# Altium PCB V24Cxx(Micro)_ky.PcbDoc
Units mm, origin at the board's own origin, x right, y up, seen from the top; angles counter-clockwise.
Board outline 77.5 x 78 mm, 2 copper layers (Top Layer, Bottom Layer); 10 components, 8 nets, 95 pads, 12 vias.
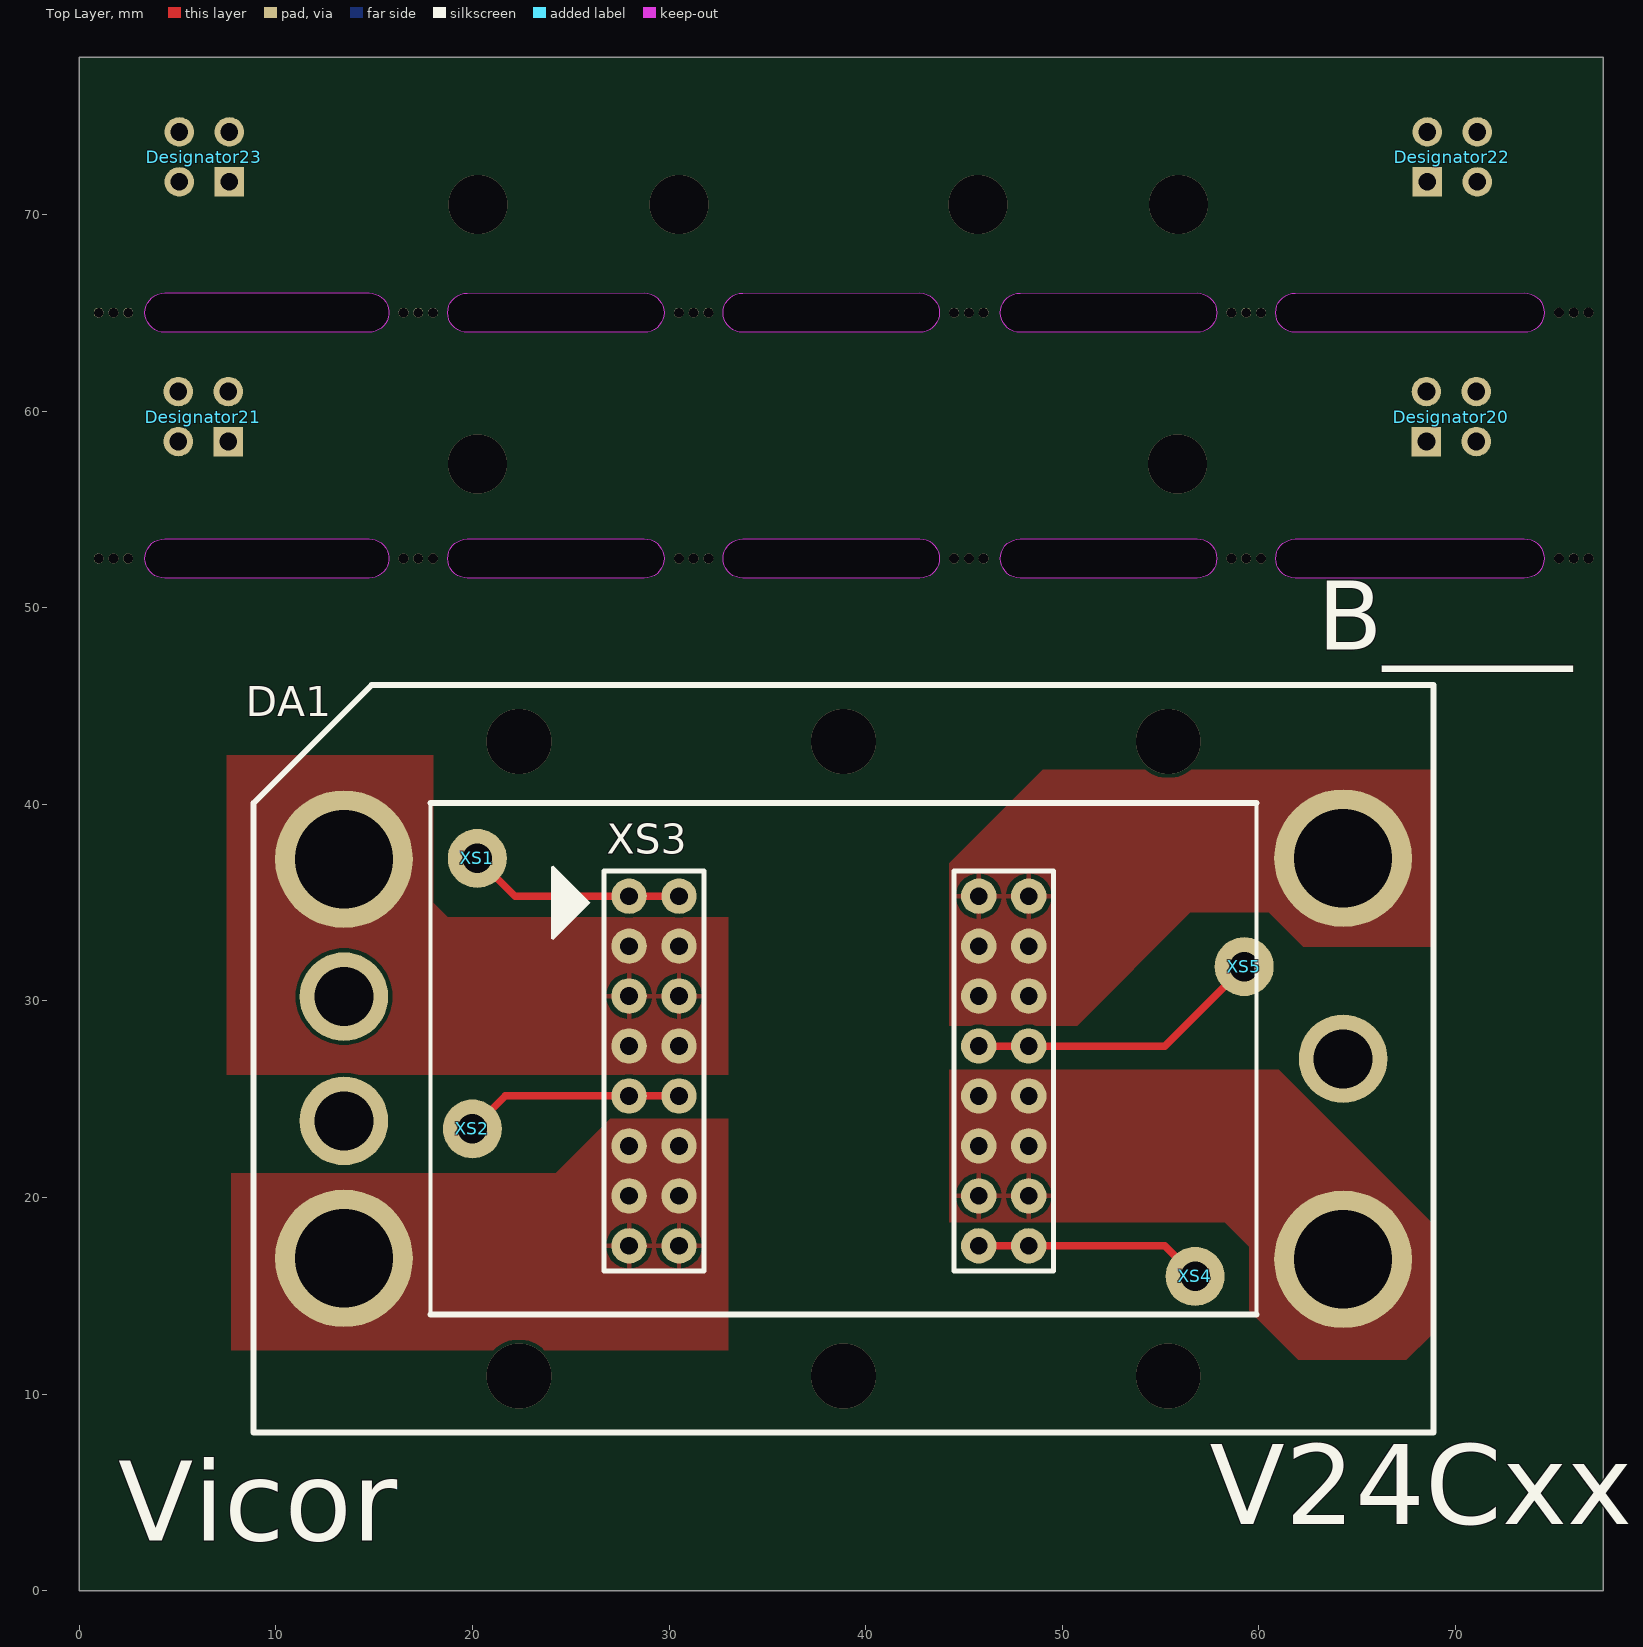
[diagram p0: Top Layer view]
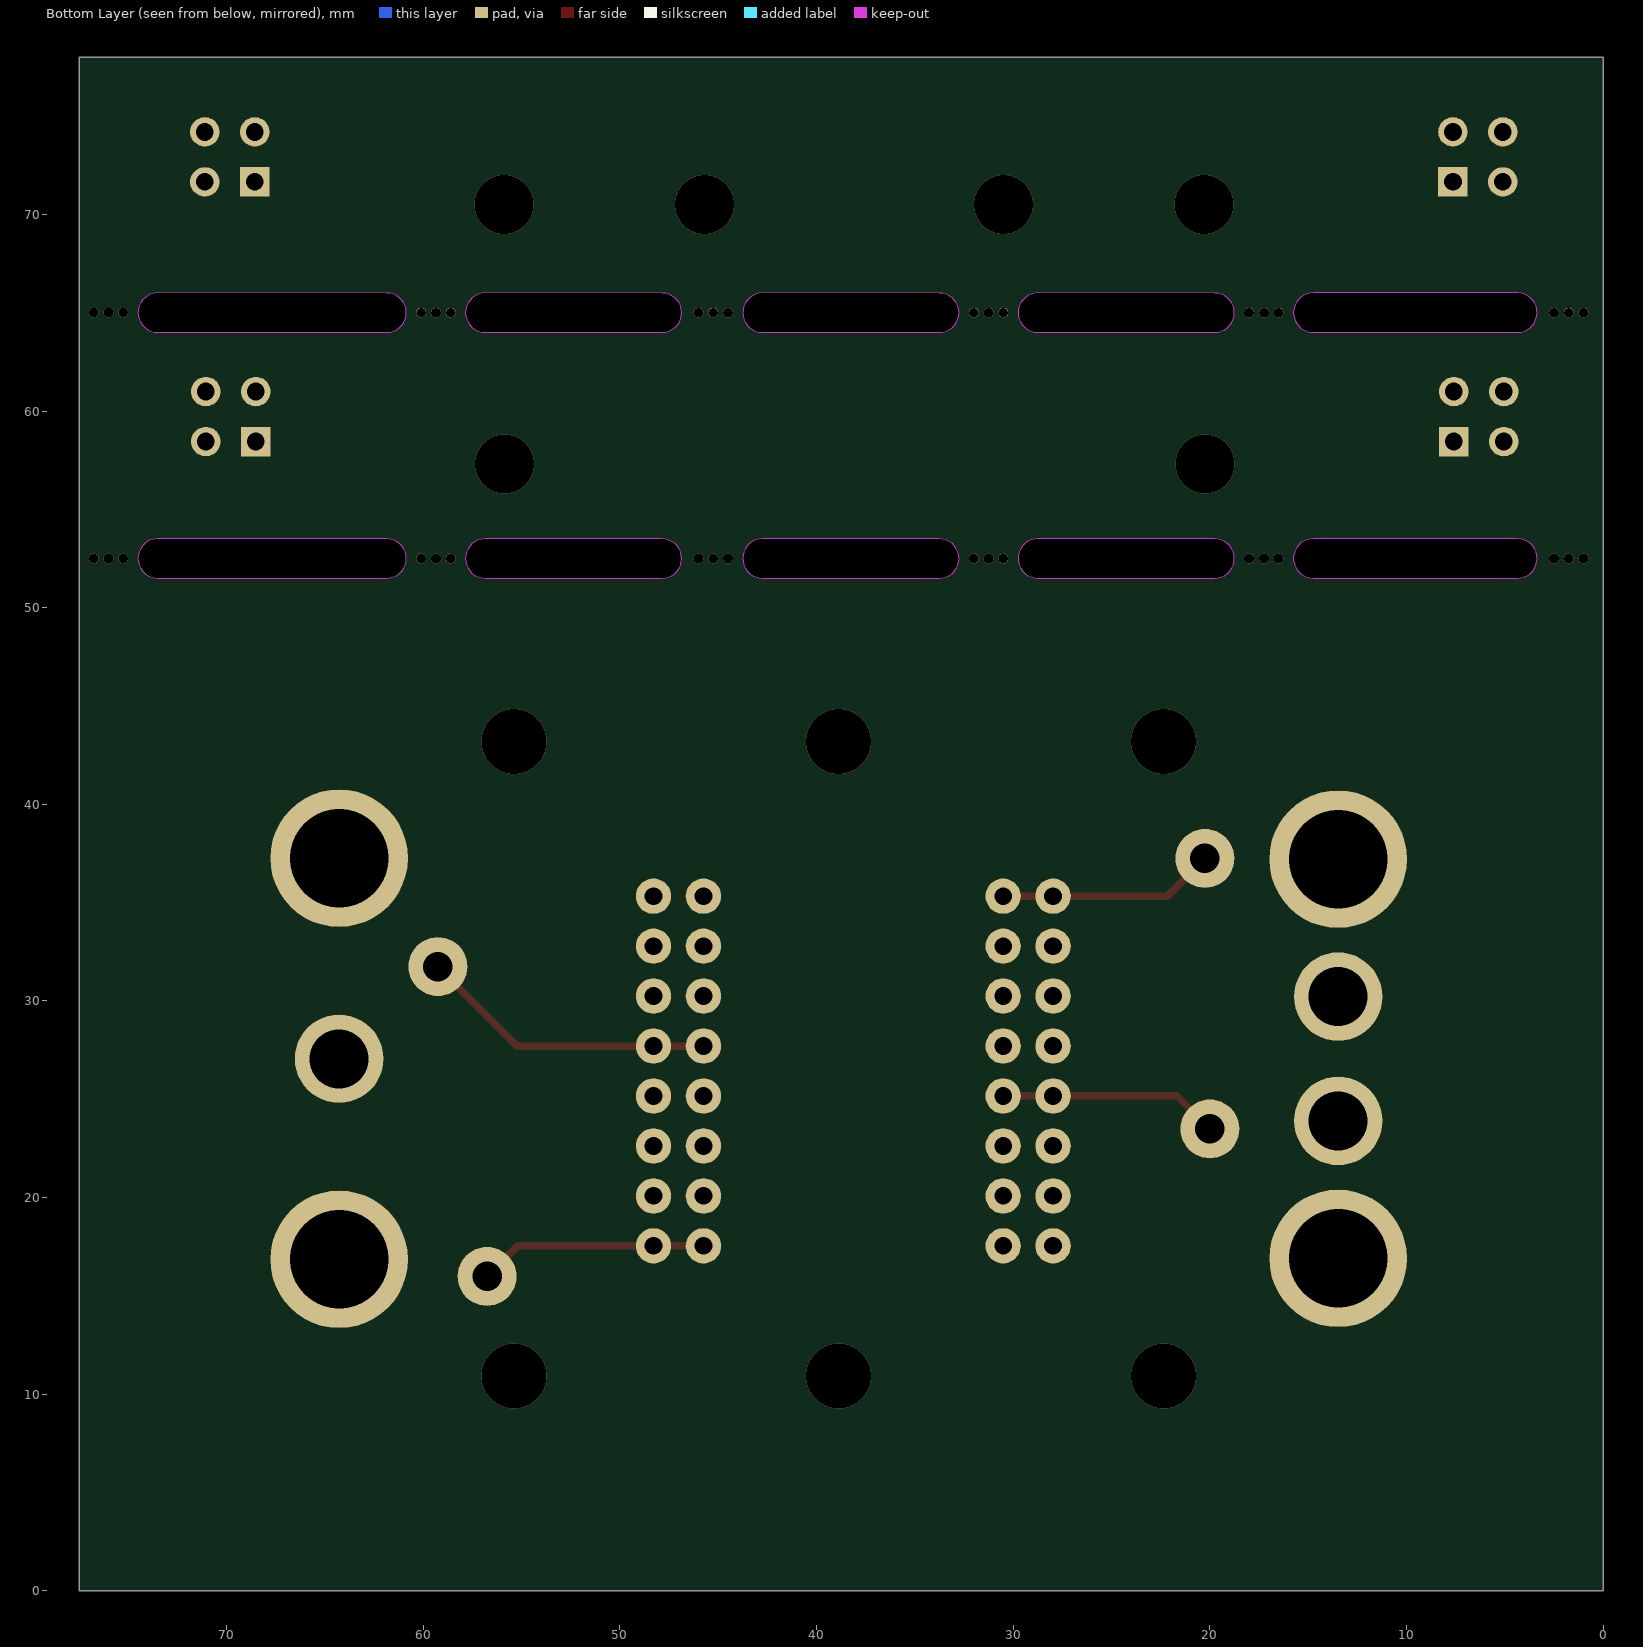
[diagram p1: Bottom Layer view, seen from below]

## Layer stack, top to bottom
Top Solder: solder mask 0.0102, Solder Resist, Dk 3.5
Top Layer: signal copper 0.0356
Dielectric 1: dielectric 0.32, FR-4, Dk 4.8
Bottom Layer: signal copper 0.0356
Bottom Solder: solder mask 0.0102, Solder Resist, Dk 3.5

## Board outline
0,0 0,78 77.5,78 77.5,0
cut-out: 4.351,66 14.75,66.002 cw(c14.75,65.002) 14.75,64.001 4.354,64.001 cw(c4.354,65.001)
cut-out: 19.748,66 28.75,66.001 cw(c28.75,65.001) 28.75,64 19.751,64 cw(c19.751,65)
cut-out: 33.748,66 42.75,66.001 cw(c42.75,65.001) 42.75,64 33.751,64 cw(c33.751,65)
cut-out: 47.848,66 56.85,66.001 cw(c56.85,65.001) 56.85,64 47.851,64 cw(c47.851,65)
cut-out: 61.848,66 73.5,66.002 cw(c73.5,65.001) 73.5,64 61.851,64 cw(c61.851,65)
cut-out: 61.848,53.5 73.5,53.502 cw(c73.5,52.501) 73.5,51.5 61.851,51.5 cw(c61.851,52.5)
cut-out: 47.848,53.5 56.85,53.501 cw(c56.85,52.501) 56.85,51.5 47.851,51.5 cw(c47.851,52.5)
cut-out: 33.748,53.5 42.75,53.501 cw(c42.75,52.501) 42.75,51.5 33.751,51.5 cw(c33.751,52.5)
cut-out: 19.748,53.5 28.75,53.501 cw(c28.75,52.501) 28.75,51.5 19.751,51.5 cw(c19.751,52.5)
cut-out: 4.351,53.5 14.75,53.502 cw(c14.75,52.502) 14.75,51.501 4.354,51.501 cw(c4.354,52.501)

## Design rules (kind name [scope] priority, off if disabled: settings)
BoardOutlineClearance [All] p1: gap=0.5 ignorepadtopadclearanceinfootprint=FALSE
Clearance [All] p1: gap=0.2 ignorepadtopadclearanceinfootprint=FALSE
ComponentClearance [All] p1: gap=0.254 collisioncheckmode=3 verticalgap=-1816.048 showdistances=FALSE
DiffPairsRouting [All] p1: maxlimit=0.15 minlimit=0.15 mostfreqgap=0.15 toplayer_minwidth=0.25 toplayer_maxwidth=0.25 toplayer_prefwidth=0.25 bottomlayer_minwidth=0.25 bottomlayer_maxwidth=0.25 bottomlayer_prefwidth=0.25 maxuncoupledlength=10
HoleSize HoleSize_UnPlatedPads [IsPad and not PadIsPlated] p1: absolutevalues=TRUE maxlimit=999 minlimit=0.5 maxpercent=80.000 minpercent=20.000
HoleSize HoleSize_PlatedPads [IsPad and PadIsPlated] p2: absolutevalues=TRUE maxlimit=999 minlimit=0.3 maxpercent=80.000 minpercent=20.000
MinimumAnnularRing MinimumAnnularRing_Pad [IsPad and PadIsPlated] p1: minimumring=0.2
MinimumAnnularRing MinimumAnnularRing_Via [IsVia] p2: minimumring=0.2
MinimumSolderMaskSliver [All] p1: minsoldermaskwidth=0.15
PlaneClearance [All] p1: clearance=0.3
PlaneConnect PlaneConnect_Via [IsVia] p1: planeconnectstyle=Direct reliefexpansion=0.508 reliefentries=4 reliefconductorwidth=0.254 reliefairgap=0.254
PlaneConnect PlaneConnect_Via_Thermal [IsVia or InPadClass('ThermalPads')] p2: planeconnectstyle=Direct reliefexpansion=0.508 reliefentries=4 reliefconductorwidth=0.254 reliefairgap=0.254
PlaneConnect [All] p3: planeconnectstyle=Relief reliefexpansion=0.5 reliefentries=4 reliefconductorwidth=0.25 reliefairgap=0.3
PolygonConnect PolygonConnect_Via [IsVia] p1: connectstyle=Direct reliefconductorwidth=0.254 reliefentries=4 polygonreliefangle="90 Angle" airgapwidth=0.254
PolygonConnect [All] p2: connectstyle=Relief reliefconductorwidth=0.25 reliefentries=4 polygonreliefangle="90 Angle" airgapwidth=0.25
RoutingVias [All] p1: holewidth=0.8 width=1.2 viastyle="Through Hole" minholewidth=0.3 minwidth=0.8 maxholewidth=1 maxwidth=1.4
SMDNeckDown [All] p1: percent=100.000
SilkToSolderMaskClearance [IsPad vs IsText] p1: minsilkscreentomaskgap=0.05 clearancetoexposedcopper=TRUE
SolderMaskExpansion SolderMaskExpansion_Vias [IsVia] p1: expansion=-5 istentingtop=FALSE
SolderMaskExpansion SolderMaskExpansion_Pads [IsPad] p2: expansion=0.05 istentingtop=FALSE
Width Width_PWR [InNetClass('Power')] p1: maxlimit=10 minlimit=0.6 preferedwidth=0.6
Width [All] p2: maxlimit=10 minlimit=0.15 preferedwidth=0.25
Width Width_ex [OnTopLayer or OnBottomLayer] p3: maxlimit=0.15 minlimit=0.15 preferedwidth=0.15
Width Width_4inner [OnCopper and not (OnTopLayer or OnBottomLayer)] p4: maxlimit=10 minlimit=0.15 preferedwidth=0.15
23 further rules are at their usual default settings.

## Classes and differential pairs
component class V24Cxx(Micro)_Sh1: DA1 XS1 XS2 XS3 XS4 XS5

## Components (designator, comment, footprint, x,y, rotation, side; value= is the part's Value field where it differs from the comment)
DA1 "DCDC_V24Cxxx" V24CxxxBxx 38.874,27.063 r0 top locked
Designator20 "Comment" PBD-4-3D#1 68.512,58.449 r90 top
Designator21 "Comment" PBD-4-3D#2 7.592,58.449 r90 top
Designator22 "Comment" PBD-4-3D#1 68.56,71.65 r90 top
Designator23 "Comment" PBD-4-3D#2 7.64,71.65 r90 top
XS1 "pin" Centr_PIN 20.25,37.25 r0 top
XS2 "pin" Centr_PIN 20,23.5 r0 top
XS3 "ACDC_socket" KU-DC/DC 27.97,35.33 r0 top locked
XS4 "pin" Centr_PIN 56.75,16 r0 top
XS5 "pin" Centr_PIN 59.25,31.75 r0 top

## Footprints (in the part's own frame and the unit in brackets; to place one, negate y for a bottom-side part, rotate by r counter-clockwise, add the part's x,y. Pads: shape width x height; smd on the part's side, far side on the other; paste and mask are expansions set on the pad)
Centr_PIN [mm]
  round 3 hole 1.5 unplated: 1(0,0)
KU-DC/DC [mm]
  round 1.8 hole 0.9: 1(0,0) 1(2.54,0) 2(0,-7.62) 2(0,-5.08) 2(0,-2.54) 2(2.54,-7.62) 2(2.54,-5.08) 2(2.54,-2.54) 3(0,-10.16) 3(2.54,-10.16) 4(0,-17.78) 4(0,-15.24) 4(0,-12.7) 4(2.54,-17.78) 4(2.54,-15.24) 4(2.54,-12.7) 5(17.78,-15.24) 5(17.78,-12.7) 5(17.78,-10.16) 5(20.32,-15.24) 5(20.32,-12.7) 5(20.32,-10.16) 6(17.78,-17.78) 6(20.32,-17.78) 7(17.78,-5.08) 7(17.78,-2.54) 7(17.78,0) 7(20.32,-5.08) 7(20.32,-2.54) 7(20.32,0) 8(17.78,-7.62) 8(20.32,-7.62)
  silkscreen extent -1.27,-19.05 21.59,1.27, body extent -1.27,-18.99 21.59,1.25, height 1.76
PBD-4-3D#1 [mm] "Connector; Header; 2x2 Position"
  rect 1.5x1.5 hole 0.9: 1(0,0)
  round 1.5 hole 0.9: 2(0,-2.54) 3(2.54,0) 4(2.54,-2.54)
  body extent -1.27,-3.81 3.81,1.27, height 3.15
PBD-4-3D#2 [mm] "Connector; Header; 2x2 Position"
  rect 1.5x1.5 hole 0.9: 1(0,0)
  round 1.5 hole 0.9: 2(0,2.54) 3(2.54,0) 4(2.54,2.54)
  body extent -1.27,-1.27 3.81,3.81, height 8.5
V24CxxxBxx [mm]
  round 7 hole 5: 1(-25.4,10.15) 4(-25.4,-10.15) 5(25.4,-10.2) 7(25.4,10.2)
  round 4.5 hole 3: 2(-25.4,3.16) 3(-25.4,-3.16) 6(25.4,0)
  silkscreen extent -30,-19 30,19

## Part data
XS1 XS2 XS4 XS5: library part CP_1

## Free pads (board coordinates)
  round 0.5 hole 0.5: 16(18,52.5) 16(18,65) 16(32,52.5) 16(32,65) 16(46,52.5) 16(46,65) 16(60.1,52.5) 16(60.1,65) 16(75.251,52.501) 16(75.251,65.001) 17(1.75,52.5) 17(1.75,65) 17(17.25,52.5) 17(17.25,65) 17(31.25,52.5) 17(31.25,65) 17(45.25,52.5) 17(45.25,65) 17(59.35,52.5) 17(59.35,65) 17(76.001,52.501) 17(76.001,65.001) 18(1,52.5) 18(1,65) 18(2.5,52.5) 18(2.5,65) 18(16.5,52.5) 18(16.5,65) 18(30.5,52.5) 18(30.5,65) 18(44.5,52.5) 18(44.5,65) 18(58.6,52.5) 18(58.6,65) 18(76.751,52.501) 18(76.751,65.001)

## Via types
v1: diameter 3, hole 3, Top Layer to Bottom Layer, 6 vias
v2: diameter 3.3, hole 3.3, Top Layer to Bottom Layer, 6 vias

## Nets (pads, with @x,y where several pads share a name; then routed paths per layer and width w, separated by ;. In a path a pad name is that pad's centre, name@x,y a point inside that pad or via, vN(x,y) a via of type N, cw(c..) or ccw(c..) an arc to the next point about the centre after c; other vN are vias at no path point)
in+: DA1.1 XS3.2
in-: DA1.4 XS3.4
out+: DA1.7 XS3.7
out-: DA1.5 XS3.5
PV+: XS3.8 XS5.1 | length 15.2
  Top Layer w0.381: XS3.8@45.75,27.71 48.29,27.71 55.21,27.71 XS5.1
PV-: XS3.6 XS4.1 | length 11.6
  Top Layer w0.381: XS3.6@45.75,17.55 48.29,17.55 55.2,17.55 XS4.1
SEN+: XS1.1 XS3.1 | length 11.1
  Top Layer w0.381: XS1.1 22.17,35.33 27.97,35.33 XS3.1@30.51,35.33
SEN-: XS2.1 XS3.3 | length 11.2
  Top Layer w0.381: XS2.1 21.67,25.17 27.97,25.17 XS3.3@30.51,25.17
pads on no net: DA1.2 DA1.3 DA1.6 Designator20.1 Designator20.2 Designator20.3 Designator20.4 Designator21.1 Designator21.2 Designator21.3 Designator21.4 Designator22.1 Designator22.2 Designator22.3 Designator22.4 Designator23.1 Designator23.2 Designator23.3 Designator23.4
copper on no net:
  other v1: 20.252,57.299 55.852,57.299 20.3,70.5 30.5,70.5 45.7,70.5 55.9,70.5
  other v2: 22.364,10.933 38.874,10.933 55.384,10.933 22.364,43.193 38.874,43.193 55.384,43.193

## Polygon pours and split planes (outlines as drawn)
out- on Top Layer "NONET_L-01_P-001" (solid, pour order 3): 44.25,26.5 61,26.5 68.75,18.75 68.75,13 67.5,11.75 62,11.75 59.5,14.25 59.5,17.5 58.25,18.75 44.25,18.75
out+ on Top Layer "NONET_L-01_P-001" (solid, pour order 2): 44.25,37 49,41.75 69,41.75 69,32.75 62.25,32.75 60.5,34.5 56.5,34.5 50.75,28.75 44.25,28.75
in+ on Top Layer "NONET_L-01_P-001" (solid, pour order 0): 7.5,42.5 7.5,26.25 33,26.25 33,34.25 18.75,34.25 18,35 18,42.5
in- on Top Layer "NONET_L-01_P-001" (solid, pour order 1): 7.75,21.25 24.25,21.25 27,24 33,24 33,12.25 32.75,12.25 7.75,12.25
no net on Top Overlay "NONET_L-01_P-001" (solid): 26,35 24,37 24,33

## Silkscreen, mask and mechanical layers (free items; w line width, h text height)
Top Overlay:
  text "B____" at 63,46.713 h6
  text "V24Cxx" at 57.5,2.044 h7
  text "Vicor" at 2,1.213 h7
Board:
  lines w0.2: 4.351,53.5 14.78,53.5 ; 4.351,66 14.78,66 ; 4.352,51.5 cw(c4.352,52.5) 4.352,53.5 ; 4.352,64 cw(c4.352,65) 4.352,66 ; 4.354,51.501 14.78,51.501 ; 4.354,64.001 14.78,64.001 ; 14.75,51.501 ccw(c14.75,52.501) 14.75,53.501 ; 14.75,64.001 ccw(c14.75,65.001) 14.75,66.001 ; 28.75,51.5 ccw(c28.75,52.5) 28.75,53.5 ; 28.75,64 ccw(c28.75,65) 28.75,66 ; 28.78,51.5 19.75,51.5 cw(c19.75,52.5) 19.75,53.5 28.78,53.5 ; 28.78,64 19.75,64 cw(c19.75,65) 19.75,66 28.78,66 ; 42.75,51.5 ccw(c42.75,52.5) 42.75,53.5 ; 42.75,64 ccw(c42.75,65) 42.75,66 ; 42.78,51.5 33.75,51.5 cw(c33.75,52.5) 33.75,53.5 42.78,53.5 ; 42.78,64 33.75,64 cw(c33.75,65) 33.75,66 42.78,66 ; 56.85,51.5 ccw(c56.85,52.5) 56.85,53.5 ; 56.85,64 ccw(c56.85,65) 56.85,66 ; 56.88,51.5 47.85,51.5 cw(c47.85,52.5) 47.85,53.5 56.88,53.5 ; 56.88,64 47.85,64 cw(c47.85,65) 47.85,66 56.88,66 ; 73.5,64 ccw(c73.5,65) 73.5,66 61.85,66 ccw(c61.85,65) 61.85,64 73.5,64 ; 61.85,51.5 cw(c61.85,52.5) 61.85,53.5 73.5,53.5 cw(c73.5,52.5) 73.5,51.5 61.85,51.5
  lines w0.25: 0,0 0,78 77.5,78 77.5,0 0,0